# Altium PCB fin-microphone.PcbDoc
Units mm, origin at the board's own origin, x right, y up, seen from the top; angles counter-clockwise.
Board outline 54 x 54 mm, 2 copper layers (Top Layer, Bottom Layer); 27 components, 15 nets, 56 pads, 1 vias.
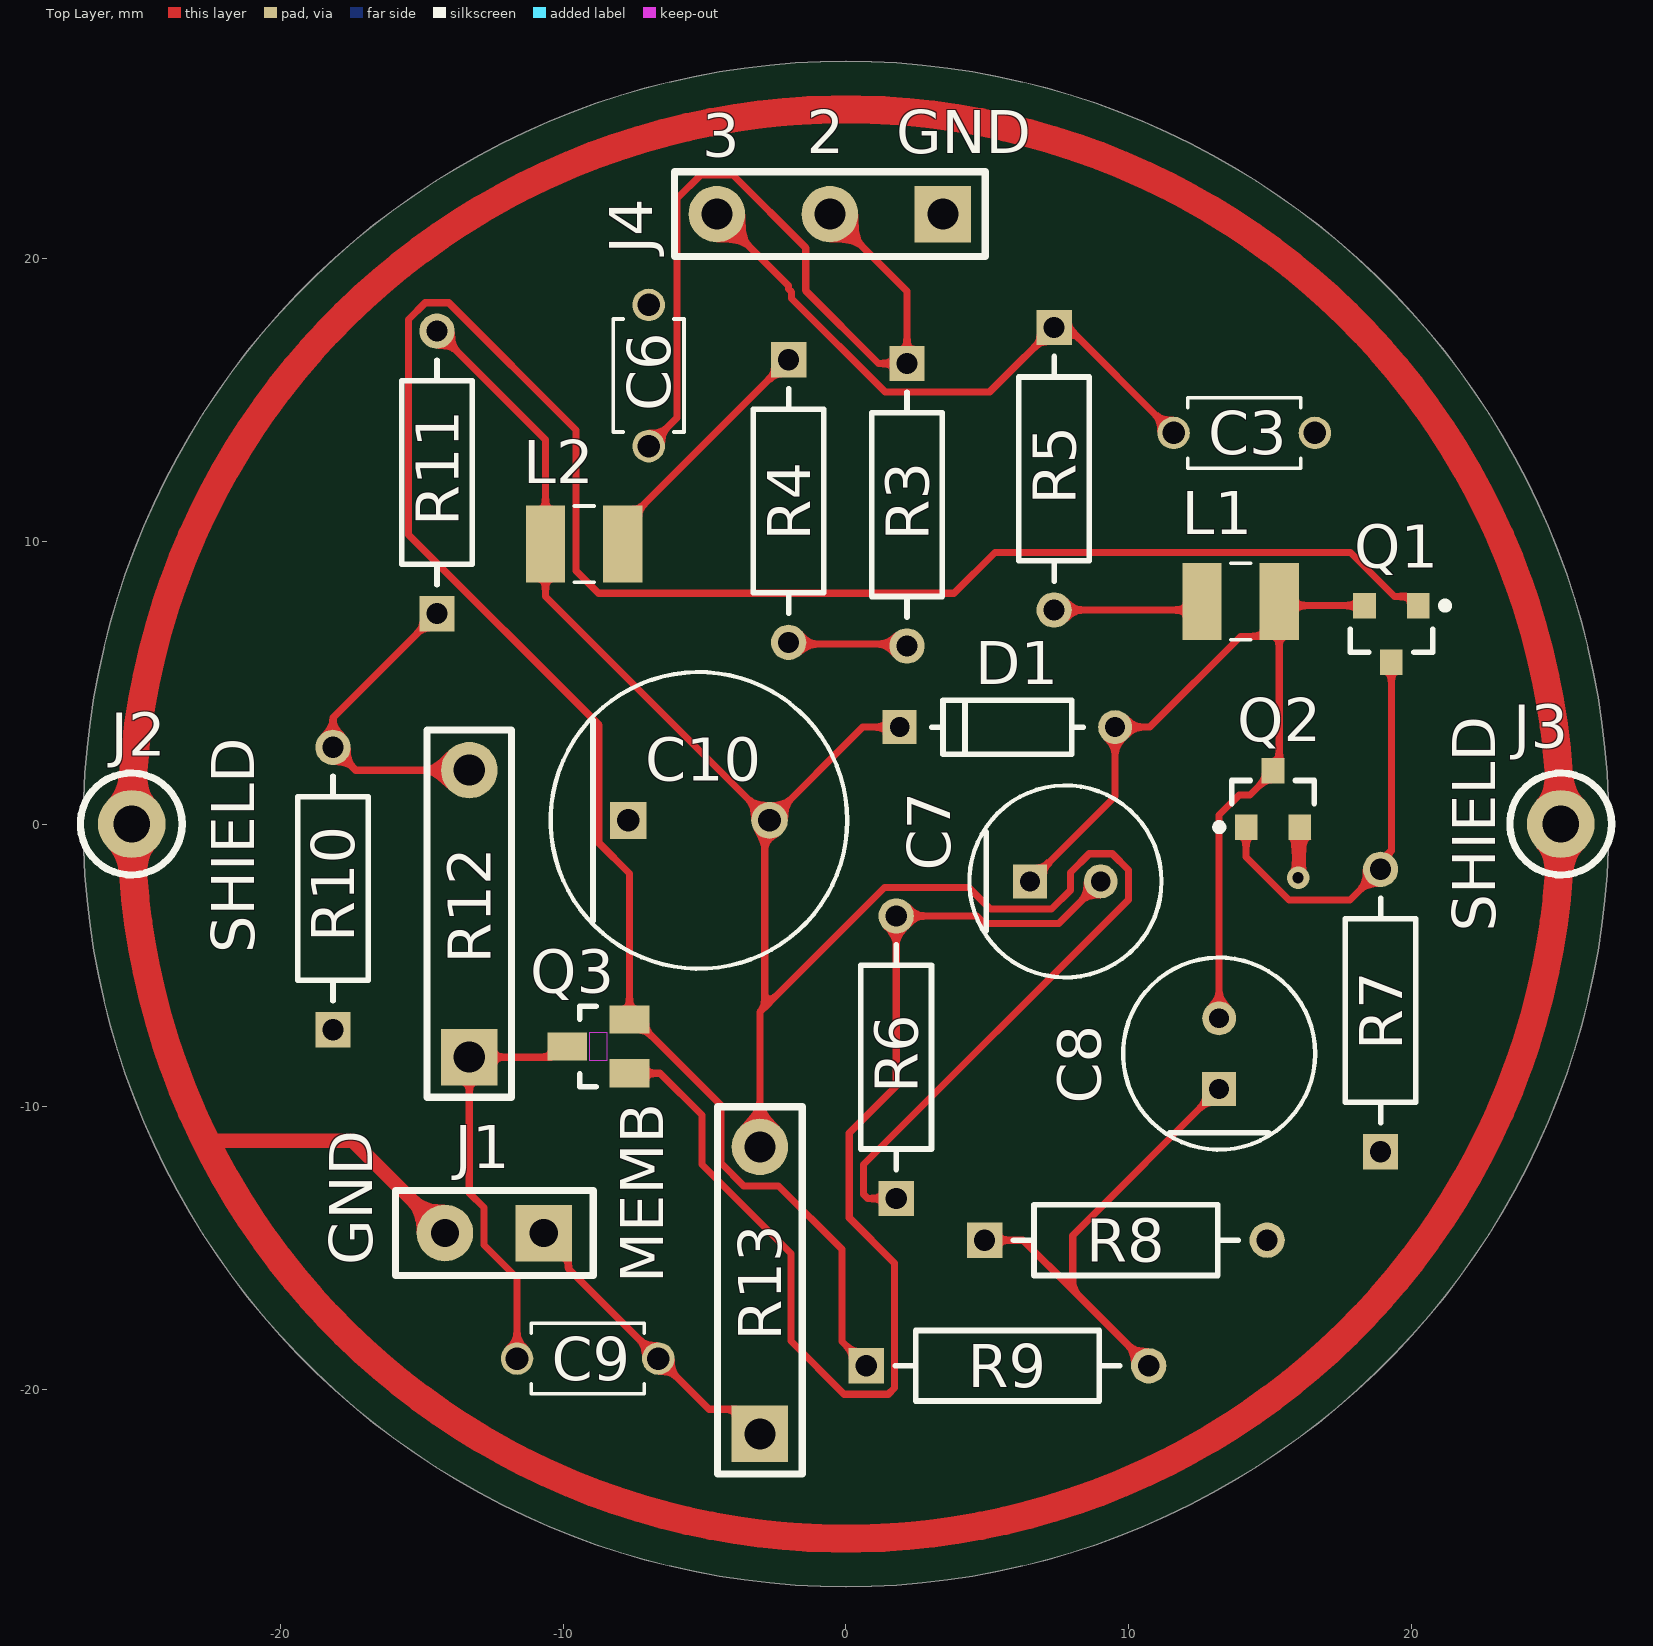
[diagram p0: Top Layer view]
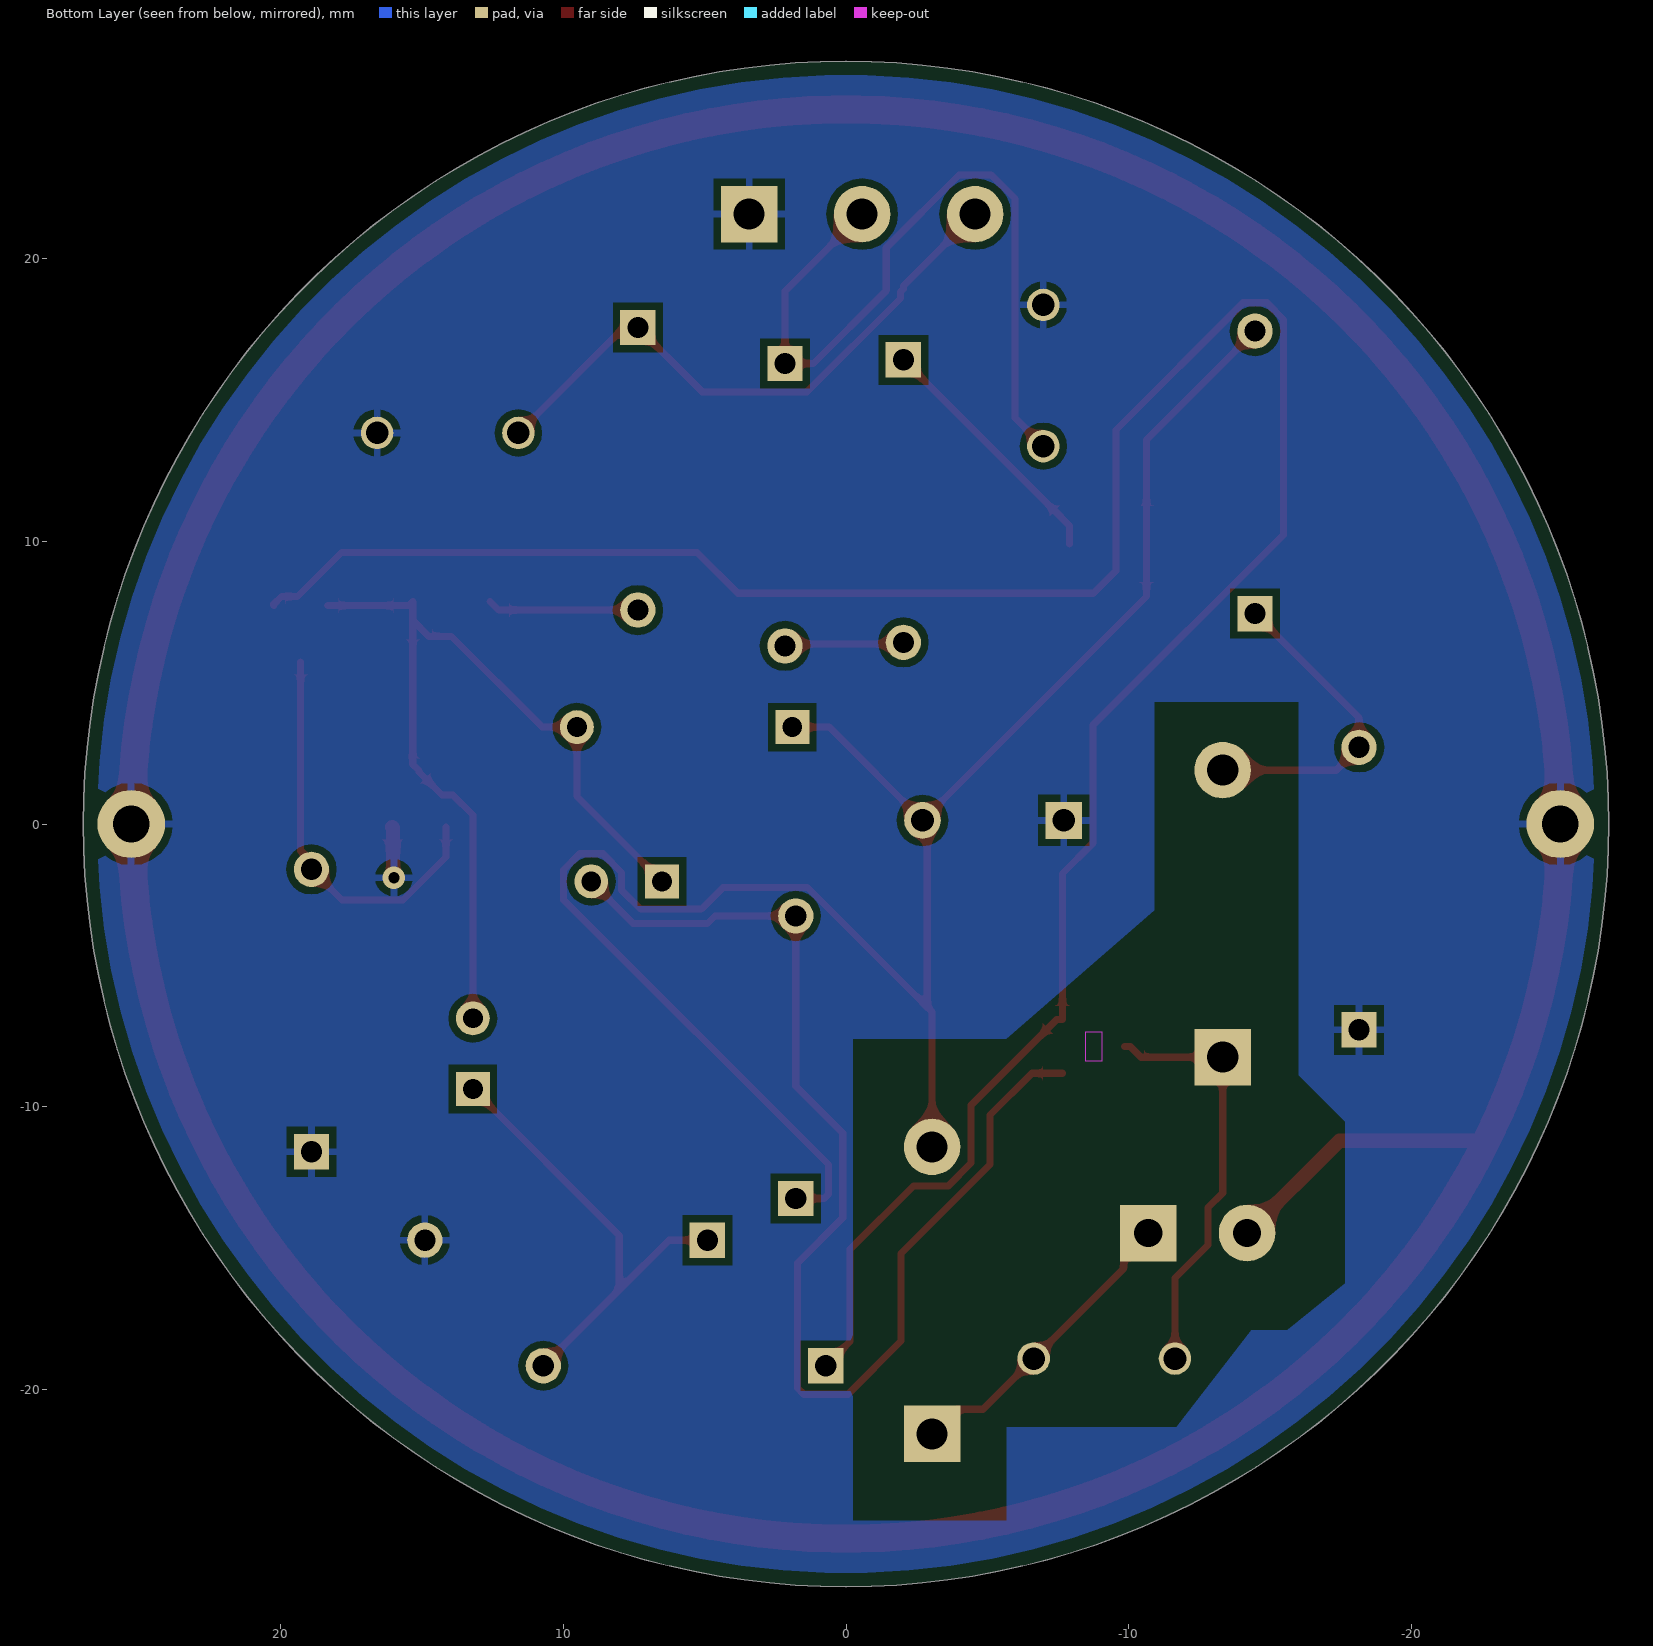
[diagram p1: Bottom Layer view, seen from below]
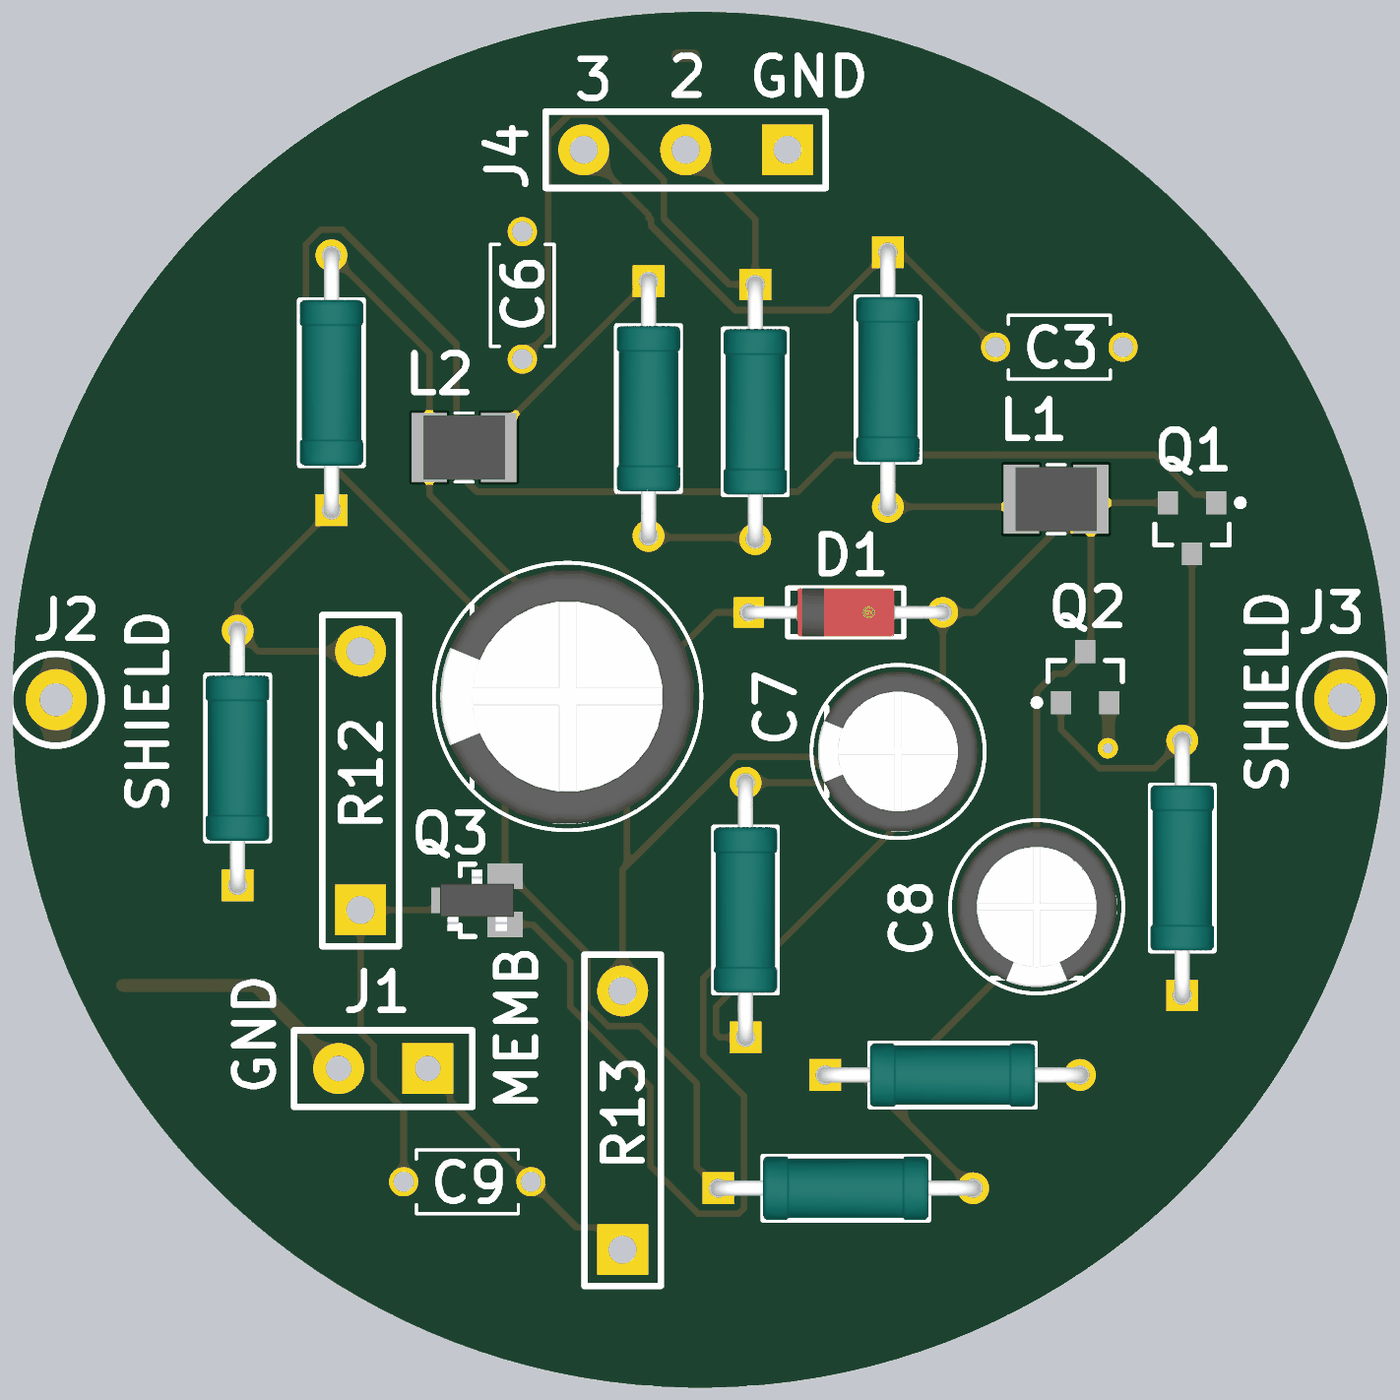
[diagram p2: 3D render of the assembled board from above, using the file's embedded part models]

## Layer stack, top to bottom
Top Solder: solder mask 0.0102, Solder Resist, Dk 3.5
Top Layer: signal copper 0.0356
Dielectric 1: dielectric 0.32, FR-4, Dk 4.8
Bottom Layer: signal copper 0.0356
Bottom Solder: solder mask 0.0102, Solder Resist, Dk 3.5

## Board outline
-27,0 ccw(c0,0) 0,-27 ccw(c0,0) 27,0 ccw(c0,0) 0,27 ccw(c0,0)

## Design rules (kind name [scope] priority, off if disabled: settings)
Clearance [All] p1: gap=0.254 ignorepadtopadclearanceinfootprint=FALSE
PolygonConnect [All] p1: connectstyle=Relief reliefconductorwidth=0.254 reliefentries=4 polygonreliefangle="90 Angle" airgapwidth=0.254
RoutingVias [All] p1: holewidth=0.4 width=0.8 viastyle="Through Hole" minholewidth=0.4 minwidth=0.8 maxholewidth=0.4 maxwidth=0.8
SolderMaskExpansion [All] p1: expansion=0 istentingtop=FALSE
SupplyNets "Schematic Supply Nets" [InNet('GND')] p1: voltage=0.000
Width Width_GND [InNet('GND')] p1: maxlimit=2 minlimit=0.254 preferedwidth=0.5
Width [All] p2: maxlimit=0.254 minlimit=0.254 preferedwidth=0.254
30 further rules are at their usual default settings.

## Components (designator, comment, footprint, x,y, rotation, side; value= is the part's Value field where it differs from the comment)
C3 "680p" *CAPRB500W50L400T250H550 14.097,13.843 r180 top
C6 "680p" *CAPRB500W50L400T250H550 -6.985,15.875 r90 top
C7 "47u" FP-RAD-TH-D_6_3_0_5-L_11-MFG 7.767,-2.032 r0 top
C8 "47u" FP-RAD-TH-D_6_3_0_5-L_11-MFG 13.208,-8.128 r90 top
C9 "1n" *CAPRB500W50L400T250H550 -9.144,-18.923 r180 top
C10 "470u" FP-RAD-TH-D_10_0_5-L_20_2-MFG -5.207,0.127 r0 top
D1 "1N4148" FP-017AG-MFG 5.712,3.429 r0 top
J1 "CAPSULE" WIRE_CAPSULE_1x02 -12.446,-14.478 r180 top
J2 "BRAID" WIRE_GND_1x01#1 -25.3,0 r0 top
J3 "BRAID" WIRE_GND_1x01#2 25.3,0 r0 top
J4 "XLR" WIRE_XLR_1x03 -0.572,21.59 r180 top
L1 "1uH" INDC3225X170N 13.97,7.874 r0 top
L2 "1uH" INDC3225X170N -9.271,9.906 r180 top
Q1 "BC857BLT1G" ONSC-SOT-23-3-318-08_V 19.304,6.731 r270 top
Q2 "BC847CLT1G" ONSC-SOT-23-3-318-08_V 15.113,0.889 r90 top
Q3 "MMBF5457" SOT23 -8.763,-7.874 r90 top
R3 "6R" FP-MRS25-MFG 2.159,11.303 r270 top
R4 "47R" FP-MRS25-MFG -2.032,11.43 r270 top
R5 "47R" FP-MRS25-MFG 7.366,12.573 r270 top
R6 "47k" FP-MRS25-MFG 1.778,-8.255 r90 top
R7 "5k6" FP-MRS25-MFG 18.923,-6.604 r90 top
R8 "47k" FP-MRS25-MFG 9.906,-14.732 r0 top
R9 "12k" FP-MRS25-MFG 5.715,-19.177 r0 top
R10 "1M" FP-MRS25-MFG -18.161,-2.286 r90 top
R11 "2M" FP-MRS25-MFG -14.478,12.446 r90 top
R12 "3G" SM102_RADIAL -13.335,-3.175 r90 top
R13 "3G" SM102_RADIAL -3.048,-16.51 r90 top

## Footprints (in the part's own frame and the unit in brackets; to place one, negate y for a bottom-side part, rotate by r counter-clockwise, add the part's x,y. Pads: shape width x height; smd on the part's side, far side on the other; paste and mask are expansions set on the pad)
*CAPRB500W50L400T250H550 [mm]
  round 1.15 hole 0.8: 1(-2.5,0) 2(2.5,0)
  silkscreen extent -2,-1.25 2,1.25
FP-017AG-MFG [mm]
  rect 1.2x1.2 hole 0.7 paste-2539.97 mask+0: 1(-3.813,0)
  round 1.2 hole 0.7 paste-2539.97 mask+0: 2(3.813,0)
  silkscreen extent -2.68,-0.95 2.68,0.95, body extent -4.51,-1.05 4.51,1.05, height 0.25
FP-MRS25-MFG [mm]
  rect 1.25x1.25 hole 0.75 paste-2539.97 mask+0: 1(-5,0)
  round 1.25 hole 0.75 paste-2539.97 mask+0: 2(5,0)
  silkscreen extent -3.98,-1.25 3.98,1.25, body extent -5.72,-1.35 5.72,1.35, height 0.25
FP-RAD-TH-D_6_3_0_5-L_11-MFG [mm]
  rect 1.2x1.2 hole 0.7 paste-2539.97 mask+0: 1(-1.25,0)
  round 1.2 hole 0.7 paste-2539.97 mask+0: 2(1.25,0)
  silkscreen extent -3.4,-3.4 3.4,3.4, body extent -3.5,-3.5 3.5,3.5, height 0.25
FP-RAD-TH-D_10_0_5-L_20_2-MFG [mm]
  rect 1.3x1.3 hole 0.8 paste-2539.97 mask+0: 1(-2.5,0)
  round 1.3 hole 0.8 paste-2539.97 mask+0: 2(2.5,0)
  silkscreen extent -5.25,-5.25 5.25,5.25, body extent -5.35,-5.35 5.35,5.35, height 0.25
INDC3225X170N [mm]
  rect 1.39x2.72 smd paste+0 mask+0.102: 1(-1.365,0) 2(1.365,0)
  silkscreen extent -0.35,-1.35 0.35,1.35, body extent -1.6,-1.25 1.6,1.25, height 1.7
ONSC-SOT-23-3-318-08_V [mm] "SOT23, 3-Leads, Body 2.92x1.3mm, Pitch 0.95mm"
  rect 0.9x0.8 smd: 1(-1,0.95) 2(-1,-0.95) 3(1,0)
  silkscreen extent -1.12,-1.46 0.65,2.03, body extent -0.65,-1.46 0.65,1.46, height 1.11
SM102_RADIAL [mm] "Ohmite Slim-Mox SM102, radial, pitch 10.16mm"
  rect 2x2 hole 1.1: 1(-5.08,0)
  round 2 hole 1.1: 2(5.08,0)
  silkscreen extent -6.5,-1.5 6.5,1.5
SOT23 [mm]
  rect 1x1.4 smd: 1(-0.95,-1.1) 2(0.95,-1.1) 3(0,1.1)
  Keep-Out Layer region: 0.5,-0.3 -0.501,-0.3 -0.501,0.3 0.5,0.3
  silkscreen extent -1.42,0.08 1.42,0.66, body extent -1.2,-1.45 1.2,1.45, height 1.11
WIRE_CAPSULE_1x02 [mm]
  rect 2x2 hole 1: 1(-1.75,0)
  round 2 hole 1: 2(1.75,0)
  silkscreen extent -3.5,-1.5 3.5,1.5
WIRE_GND_1x01#1 [mm]
  round 2.4 hole 1.3: 1(0.02,0)
  silkscreen extent -1.8,-1.8 1.8,1.8
WIRE_GND_1x01#2 [mm]
  round 2.4 hole 1.3: 1(0,0)
  silkscreen extent -1.8,-1.8 1.8,1.8
WIRE_XLR_1x03 [mm]
  rect 2x2 hole 1.1: 1(-4,0)
  round 2 hole 1.1: 2(0,0) 3(4,0)
  silkscreen extent -5.5,-1.5 5.5,1.5

## Part data
C3 C6 C9: library part FG28C0G2A681JNT00, MANUFACTURER=TDK, MAXIMUM_PACKAGE_HEIGHT="0.0 mm", PARTREV=20200310, SOURCE_URL=https://www.snapeda.com/parts/FG28C0G2A681JNT00/TDK/view-part/?ref=snap, STANDARD=IPC-7351B
C7 C8: library part CMP-05427-001321-1, "Aluminum Electrolytic Capacitors (Radial Lead Type) 47uF ±20% 50V", Capacitance=47uF, Case/Package=Radial, Max Operating Temperature=105°C, Min Operating Temperature=-40°C, Ripple Current=405mA, Tolerance=20%, Voltage=50V, Construction=RADIAL, Diameter=6.3mm, Height=11.2mm, Impedance=140mR, Lead Diameter=0.5mm, Lead Pitch=2.5mm, Life (Hours)=5000Hour, Packaging=Bulk, REACH SVHC=Yes, Ripple Current (AC)=405mA, RoHS Compliant=Yes, Series="FR Radial", Termination=Radial, Voltage Rating=50V
C10: library part CMP-05427-002121-1, "Aluminum Electrolytic Capacitors (Radial Lead Type) AEC-Q200 Qualified 470uF ±20% 50V"
D1: library part CMP-07163-000046-1, "DIODE GEN PURP 100V 200MA DO35", Average Rectified Current=200mA, Capacitance=4pF, Case/Package=DO-35, Current=4A, Forward Current=300mA, Forward Voltage=1V, Max Forward Surge Current (Ifsm)=1A, Max Operating Temperature=175°C, Max Power Dissipation=500mW, Max Repetitive Reverse Voltage (Vrrm)=100V, Max Reverse Current=5uA, Min Operating Temperature=-65°C, Package Quantity=2000, Contact Plating=Tin, Current Rating=200mA, Diameter=1.91mm, Element Configuration=Single, Height=4.56mm, Lead Free="Lead Free", Length=4.56mm, Max Reverse Voltage (DC)=100V, Max Surge Current=4A, Mount="Through Hole", Number of Pins=2, Output Current=200mA, Outside Diameter=1.85mm, Packaging=Bulk, Peak Non-Repetitive Surge Current=4A, Polarity=Standard, Power Dissipation=500mW, Radiation Hardening=No, REACH SVHC="No SVHC", Recovery Time=4ns, Reverse Recovery Time=4ns, Reverse Voltage=100V, Series=-, Voltage=100V, Voltage Rating (DC)=100V, Weight=0.01lb, Width=1.91mm
J1: library part CONN_CAPSULE, "Capsule wire pads (1 = membrane, 2 = backplate/GND)."
J2 J3: library part CONN_GND, "Ground braid solder pad"
J4: library part CONN_XLR, "XLR wire pads (1 = GND, 2 = HOT, 3 = COLD)."
L1 L2: library part BRL3225T1R0M, "1 ÂµH Semi-Shielded Drum Core, Wirewound Inductor 2.2 A 51.6mOhm Max 1210 (3225 Metric)", Package="3225 Taiyo Yuden", Check_prices=https://www.snapeda.com/parts/BRL3225T1R0M/Taiyo+Yuden/view-part/?ref=eda, MF="Taiyo Yuden", MP=BRL3225T1R0M, SnapEDA_Link=https://www.snapeda.com/parts/BRL3225T1R0M/Taiyo+Yuden/view-part/?ref=snap
Q1: library part CMP-1048-00798-1, "General Purpose Transistor, PNP Silicon, 3-Pin SOT-23, Pb-Free, Tape and Reel", MANUFACTURER="On Semiconductor", ComponentLink1Description="Manufacturer URL", ComponentLink1URL=http://www.onsemi.com/, ComponentLink2Description=Datasheet, ComponentLink2URL=http://www.onsemi.cn/pub_link/Collateral/BC856ALT1-D.PDF, ComponentLink3Description="Package Specification", ComponentLink3URL=http://www.onsemi.cn/pub_link/Collateral/318-08.PDF, DatasheetVersion="Rev. 13", fT Min (MHz)=100, IC Continuous (A)=-0.1, Mounting Technology="Surface Mount", PackageDescription="3-Pin Small Outline Transistor, Body 2.92 x 1.3 mm, Pitch 0.95 mm", PackageReference=SOT-23-3-318-08, PackageVersion="Rev. AP, 11/2009", Packing="Tape and Reel", PartNumber=BC857BLT1G, Polarity=PNP, RoHS=TRUE
Q2: library part CMP-1048-00770-1, "General Purpose Transistor, NPN Silicon, 3-Pin SOT-23, Pb-Free, Tape and Reel", MANUFACTURER="On Semiconductor", ComponentLink1Description="Manufacturer URL", ComponentLink1URL=http://www.onsemi.com/, ComponentLink2Description=Datasheet, ComponentLink2URL=http://www.onsemi.cn/pub_link/Collateral/BC846ALT1-D.PDF, ComponentLink3Description="Package Specification", ComponentLink3URL=http://www.onsemi.cn/pub_link/Collateral/318-08.PDF, DatasheetVersion="Rev. 11", fT Min (MHz)=100, IC Continuous (A)=0.1, Mounting Technology="Surface Mount", PackageDescription="3-Pin Small Outline Transistor, Body 2.92 x 1.3 mm, Pitch 0.95 mm", PackageReference=SOT-23-3-318-08, PackageVersion="Rev. AP, 11/2009", Packing="Tape and Reel", PartNumber=BC847CLT1G, Polarity=NPN, RoHS=TRUE
Q3: library part MMBF5457*, "JFET N-Channel 25 V 350 mW Surface Mount SOT-23-3", Package="SOT-23-3 ON Semiconductor", Check_prices=https://www.snapeda.com/parts/MMBF5457/Onsemi/view-part/?ref=eda, MF="ON Semiconductor", MP=MMBF5457, SnapEDA_Link=https://www.snapeda.com/parts/MMBF5457/Onsemi/view-part/?ref=snap
R3 R4 R5 R6 R7 R8 R9 R10 R11: library part CMP-00030-42757237-1, "MRS25000C1000FRP00 Resistor, 100 Ohm, ± 1%, 600 mW, Axial Leaded, Metal Film (Thin Film), Professional", Case/Package=Axial, Max Operating Temperature=155°C, Max Power Dissipation=600mW, Min Operating Temperature=-55°C, Resistance=100Ω, Temperature Coefficient=50ppm/°C, Tolerance=1%, Voltage Rating=350V, Composition="Metal Film, Thin Film", Contact Plating=Tin, Diameter=2.5mm, Lead Diameter=600µm, Lead Free="Lead Free", Length=6.5mm, Military Standard=Not, Mount="Through Hole", NexarPartId=42757237, Number of Pins=2, Number of Terminations=2, Packaging="Tape & Reel (TR)", Power Rating=600mW, Radiation Hardening=No, REACH SVHC=Unknown, RoHS=Compliant, Schedule B="8533210090, 8533210090", Termination=Axial, Voltage Rating (DC)=350V, Width=2.5mm
R12 R13: library part CMP-00030-42757237-1_1, "MRS25000C1000FRP00 Resistor, 100 Ohm, ± 1%, 600 mW, Axial Leaded, Metal Film (Thin Film), Professional", Case/Package=Axial, Max Operating Temperature=155°C, Max Power Dissipation=600mW, Min Operating Temperature=-55°C, Resistance=100Ω, Temperature Coefficient=50ppm/°C, Tolerance=1%, Voltage Rating=350V, Composition="Metal Film, Thin Film", Contact Plating=Tin, Diameter=2.5mm, Lead Diameter=600µm, Lead Free="Lead Free", Length=6.5mm, Military Standard=Not, Mount="Through Hole", NexarPartId=42757237, Number of Pins=2, Number of Terminations=2, Packaging="Tape & Reel (TR)", Power Rating=600mW, Radiation Hardening=No, REACH SVHC=Unknown, RoHS=Compliant, Schedule B="8533210090, 8533210090", Termination=Axial, Voltage Rating (DC)=350V, Width=2.5mm

## Via types
v1: diameter 0.8, hole 0.4, Top Layer to Bottom Layer, 1 vias

## Nets (pads, with @x,y where several pads share a name; then routed paths per layer and width w, separated by ;. In a path a pad name is that pad's centre, name@x,y a point inside that pad or via, vN(x,y) a via of type N, cw(c..) or ccw(c..) an arc to the next point about the centre after c; other vN are vias at no path point)
GND: C3.1 C6.2 C10.1 J1.2 J2.1 J3.1 J4.1 Q2.2 R7.1 R8.2 R10.1 | length 171.2
  Top Layer w0.5: -22.676,-11.211 -17.463,-11.211 J1.2 ; -0.885,25.28 -0.262,25.28 ; v1(16.002,-1.905) 16.032,-1.875 16.032,-0.142 Q2.2
  Top Layer w1: J3.1@25.296,0 ccw(c0,0) J3.1@25.296,0
NetC3_2: C3.2 J4.3 R5.1 | length 21.7
  Top Layer w0.254: J4.3 -2.032,19.05 -2.032,18.937 -1.931,18.837 -1.931,18.605 1.376,15.297 5.09,15.297 7.616,17.824 C3.2
NetC6_1: C6.1 J4.2 R3.1 | length 27.7
  Top Layer w0.254: C6.1 -5.979,14.381 -5.979,22.136 -5.144,22.971 -4,22.971 -1.423,20.395 -1.423,18.879 1.153,16.303 R3.1 2.159,18.859 J4.2
NetC7_1: C7.1 C8.2 D1.2 L1.2 Q1.2 Q2.3 | length 33
  Top Layer w0.254: C7.1 9.525,0.976 D1.2 10.754,3.429 13.966,6.641 14.767,6.641 L1.2@15.335,7.209 ; C8.2 13.208,0.323 13.917,1.031 14.305,1.031 15.113,1.839 Q2.3 15.335,2.111 L1.2@15.335,7.209 ; Q1.2 15.478,7.731 L1.2 L1.2@15.335,7.209
NetC7_2: C7.2 Q3.1 R6.2 | length 43
  Top Layer w0.254: Q3.1 -6.582,-8.824 -5.101,-10.305 -5.101,-12.048 -1.949,-15.2 -1.949,-18.302 -0.068,-20.183 1.498,-20.183 1.721,-19.96 1.721,-15.547 0.115,-13.941 0.115,-10.938 1.778,-9.275 R6.2 4.633,-3.255 4.899,-3.521 7.528,-3.521 C7.2
NetC8_1: C8.1 R8.1 R9.2 | length 16.9
  Top Layer w0.254: R8.1 6.27,-14.732 8.025,-16.486 ; R9.2 8.025,-16.486 ; C8.1 8.025,-14.561 8.025,-16.486
NetC9_1: C9.1 J1.1 R13.1 | length 10.8
  Top Layer w0.254: J1.1 -9.823,-15.351 -9.823,-15.744 C9.1 -4.85,-20.717 -3.921,-20.717 R13.1
NetC9_2: C9.2 Q3.3 R12.1 | length 15
  Top Layer w0.254: C9.2 -11.644,-16.069 -12.815,-14.898 -12.815,-13.579 -13.335,-13.059 R12.1 -10.444,-8.255 -10.063,-7.874 Q3.3
NetC10_2: C10.2 D1.1 L2.2 R6.1 R11.2 R13.2 | length 72.8
  Top Layer w0.254: R11.2 -10.636,13.604 L2.2 -10.636,8.056 C10.2 ; R13.2 -3.048,-6.658 1.361,-2.249 4.346,-2.249 5.11,-3.013 7.275,-3.013 7.943,-2.345 7.943,-1.719 8.611,-1.051 9.423,-1.051 9.998,-1.626 9.998,-2.679 0.623,-12.053 0.623,-13.106 0.772,-13.255 R6.1 ; -2.877,-6.488 -2.877,-0.044 C10.2 ; D1.1 0.595,3.429 C10.2
NetL1_1: L1.1 R5.2 | length 5.4
  Top Layer w0.254: R5.2 12.304,7.573 L1.1
NetL2_1: L2.1 R4.1 | length 9
  Top Layer w0.254: L2.1 -7.906,10.571 -7.338,11.139 -7.323,11.139 R4.1
NetQ1_1: Q1.1 Q3.2 R9.1 | length 89.2
  Top Layer w0.254: R9.1 -0.142,-18.32 -0.142,-15.054 -2.385,-12.811 -3.62,-12.811 -4.429,-12.002 -4.429,-9.958 -7.463,-6.924 Q3.2 -7.663,-1.756 -8.738,-0.681 -8.738,3.495 -15.484,10.241 -15.484,17.863 -14.895,18.452 -14.061,18.452 -9.56,13.951 -9.56,8.966 -8.759,8.165 3.825,8.165 5.275,9.615 17.859,9.615 19.42,8.054 19.981,8.054 20.254,7.781 Q1.1
NetQ1_3: Q1.3 Q2.1 R7.2 | length 14.4
  Top Layer w0.254: Q2.1 14.163,-1.171 15.679,-2.686 17.841,-2.686 R7.2 18.923,-1.334 19.304,-0.953 Q1.3
NetR3_2: R3.2 R4.2 | length 4.2
  Top Layer w0.254: R4.2 -1.968,6.366 2.095,6.366 R3.2
NetR10_2: R10.2 R11.1 R12.2 | length 11.4
  Top Layer w0.254: R11.1 -18.161,3.763 R10.2 -17.352,1.905 R12.2

## Polygon pours and split planes (outlines as drawn)
GND on Bottom Layer (solid, remove dead copper, pour order 0): -26.5,0 ccw(c0,0) 0,-26.5 ccw(c0,0) 26.5,0 ccw(c0,0) 0,26.5 ccw(c0,0)

## Other copper
Bottom Layer:
  pour cut-out: -16.002,4.318 -10.922,4.318 -10.922,-3.048 -5.664,-7.62 -0.254,-7.62 -0.254,-24.638 -5.664,-24.638 -5.664,-21.336 -8.509,-21.336 -11.684,-21.336 -14.351,-17.907 -15.621,-17.907 -17.653,-16.256 -17.653,-10.541 -16.002,-8.89

## Silkscreen, mask and mechanical layers (free items; w line width, h text height)
Top Overlay:
  text "2" at -1.397,23.749 h1.52
  text "GND" at 1.778,23.749 h1.52
  text "3" at -5.08,23.622 h1.52
  text "SHIELD" at 22.987,-3.81 h1.52 r90
  text "SHIELD" at -20.955,-4.572 h1.52 r90
  text "GND" at -16.764,-15.621 h1.52 r90
  text "MEMB" at -6.477,-16.256 h1.52 r90
Mechanical 1:
  circle w0.254: c0,0 r27